# Altium PCB Main-PCB-v1.0-3.PcbDoc (part 3 of 4)
Units mm, origin at the board's own origin, x right, y up, seen from the top; angles counter-clockwise.
Board outline 222.5 x 70.56 mm, 2 copper layers (Top Layer, Bottom Layer), stack 1.448 mm thick; 252 components, 204 nets, 813 pads, 473 vias.
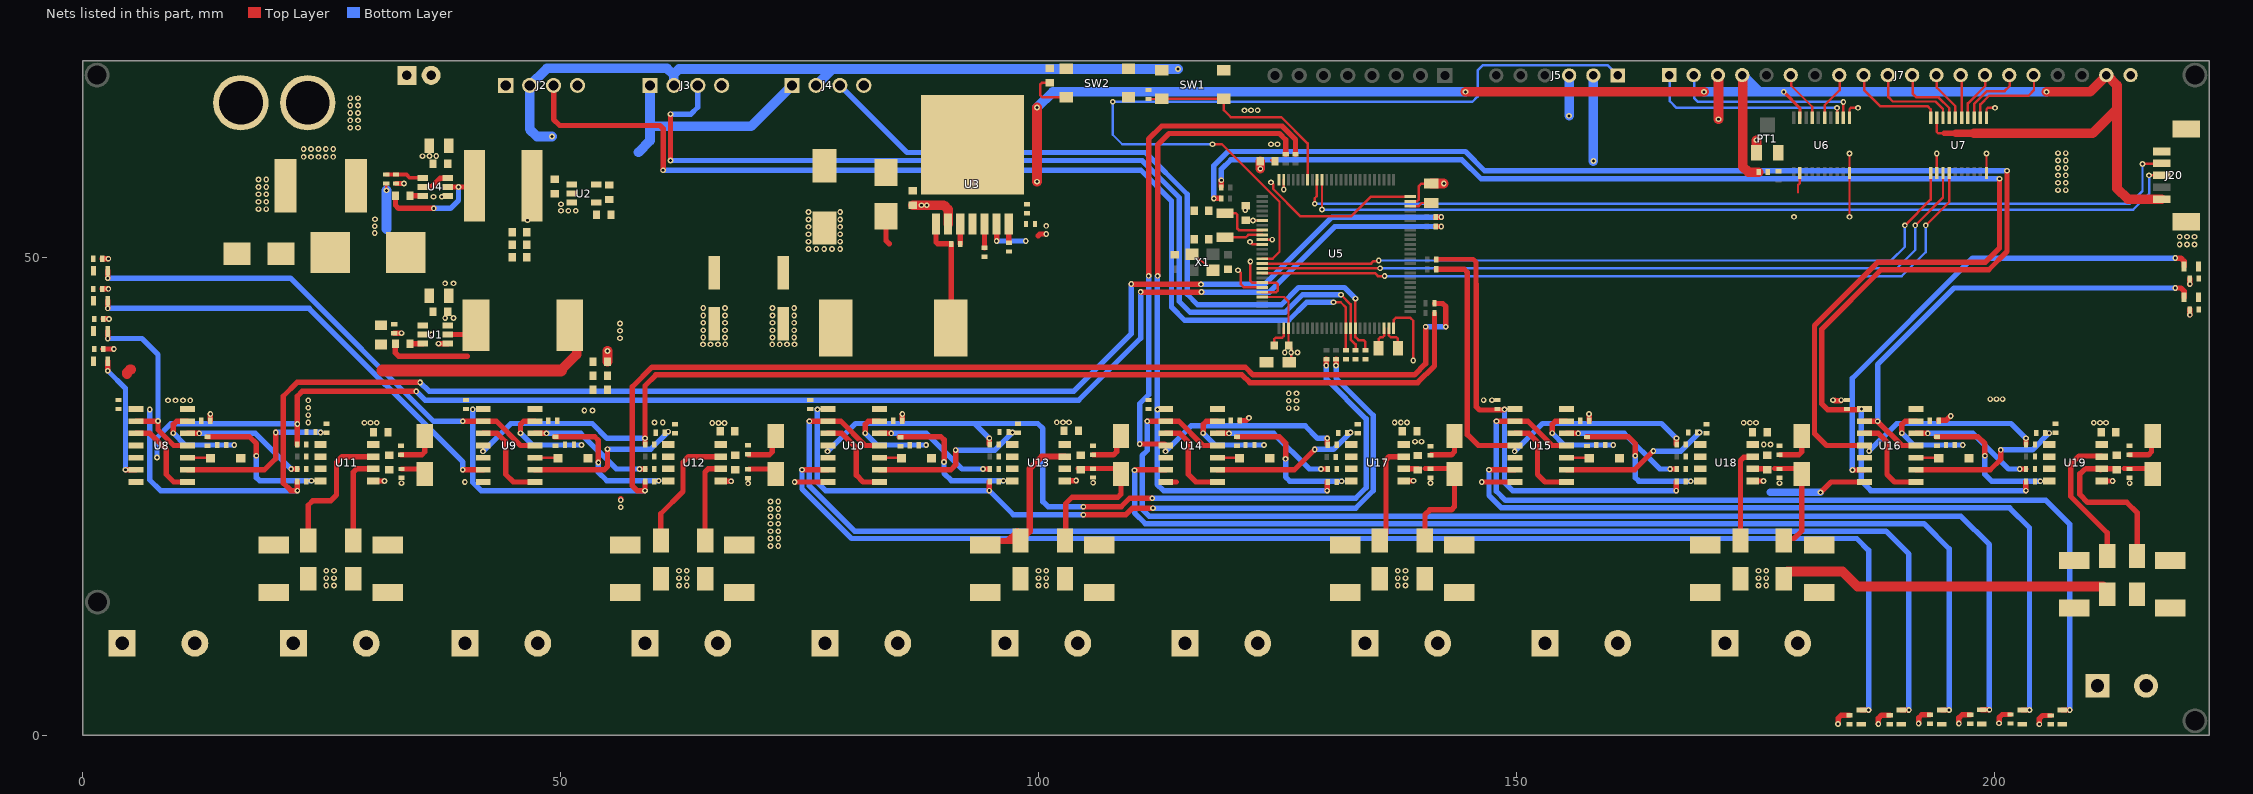
[diagram p2: the nets of this part, all layers, seen from the top]

## Part data (continued)
U3: "IC REG BUCK ADJ 5A TO263-7", Case/Package=TO-263, LCSC Part Number=C2877272, Manufacturer="TI National Semiconductor", Max Operating Temperature=125°C, Max Supply Voltage=40V, Min Input Voltage=8V, Min Operating Temperature=-40°C, Output Current=5A, Output Voltage=37V, Package Quantity=500, Quiescent Current=4.2mA, Supplier Part Number 1=926-LM2679SXADJNOPB, Switching Frequency=260kHz, Category="Voltage Regulators - Switching", ComponentLink1Description=https://datasheet.ciiva.com/6596/lm2679-6596695.pdf?src-supplier=Digi-Key, ComponentLink1URL=https://datasheet.ciiva.com/6596/lm2679-6596695.pdf?src-supplier=Digi-Key, ComponentLink2Description=https://datasheet.ciiva.com/6596/lm2679-6596699.pdf?src-supplier=Digi-Key, ComponentLink2URL=https://datasheet.ciiva.com/6596/lm2679-6596699.pdf?src-supplier=Digi-Key, ComponentLink3Description=https://datasheet.ciiva.com/6596/lm2679-6596693.pdf?src-supplier=Digi-Key, ComponentLink3URL=https://datasheet.ciiva.com/6596/lm2679-6596693.pdf?src-supplier=Digi-Key, ComponentLink4Description=https://datasheet.ciiva.com/41457/001013915-da-01-en-ic-reg-bu-lm2679sx-adj-nopb-to-263-7-tid-41457948.pdf?src-supplier=Conrad, ComponentLink4URL=https://datasheet.ciiva.com/41457/001013915-da-01-en-ic-reg-bu-lm2679sx-adj-nopb-to-263-7-tid-41457948.pdf?src-supplier=Conrad, Efficiency=84%, Item Type=IC, Lead Free="Contains Lead", Manufacturer Part Number=LM2679SX-ADJ/NOPB, Min Supply Voltage=8V, Mounting Technology="Surface Mount", Number of Outputs=1, Output Type=Adjustable, Packaging="Tape and Reel", Pricing 1="1=6.97, 10=6.26, 50=5.92, 100=5.13, 1000=3.72, 10000=3.72 (USD)", RoHS=Yes, RoHS Compliant=Yes, Series="SIMPLE SWITCHER®", Stock 1=3995, Supplier 1=Mouser, Synchronous Rectifier=No
U5: "MCU 32-bit ARM Cortex M4 RISC 1MB Flash 3.3V 100-Pin LQFP Frame", Case/Package=LQFP, LCSC Part Number=C1337293, Manufacturer=STMicroelectronics, Max Operating Temperature=85°C, Min Operating Temperature=-40°C, Supplier Part Number 1=511-STM32F413VGT6, Category=Microcontrollers, ComponentLink1Description=https://4donline.ihs.com/images/VipMasterIC/IC/SGST/SGST-S-A0003533273/SGST-S-A0003533273-1.pdf?hkey=52A5661711E402568146F3353EA87419&src-supplier=Newark, ComponentLink1URL=https://4donline.ihs.com/images/VipMasterIC/IC/SGST/SGST-S-A0003533273/SGST-S-A0003533273-1.pdf?hkey=52A5661711E402568146F3353EA87419&src-supplier=Newark, ComponentLink2Description=https://4donline.ihs.com/images/VipMasterIC/IC/SGST/SGST-S-A0003533273/SGST-S-A0003533273-1.pdf?hkey=52A5661711E402568146F3353EA87419&src-supplier=Farnell, ComponentLink2URL=https://4donline.ihs.com/images/VipMasterIC/IC/SGST/SGST-S-A0003533273/SGST-S-A0003533273-1.pdf?hkey=52A5661711E402568146F3353EA87419&src-supplier=Farnell, ComponentLink3Description=http://www.farnell.com/datasheets/2581760.pdf?src-supplier=Element14, ComponentLink3URL=http://www.farnell.com/datasheets/2581760.pdf?src-supplier=Element14, ComponentLink4Description=http://www.st.com/content/ccc/resource/technical/document/datasheet/group3/f6/1d/4a/d9/f9/96/43/2a/DM00282249/files/DM00282249.pdf/jcr:content/translations/en.DM00282249.pdf?src-supplier=Digi-Key, ComponentLink4URL=http://www.st.com/content/ccc/resource/technical/document/datasheet/group3/f6/1d/4a/d9/f9/96/43/2a/DM00282249/files/DM00282249.pdf/jcr:content/translations/en.DM00282249.pdf?src-supplier=Digi-Key, Core Architecture=ARM, Interface=I2C,SPI,USB,IrDA,MMC,SDIO,UART,USART,EBI/EMI, Item Type=IC, Manufacturer Part Number=STM32F413VGT6, Memory Format=FLASH, Memory Size=1MB, Number of I/Os=81, Oscillator Type=Internal, Packaging=Tray, Peripherals="Brown-out Detect/Reset,POR,PWM,WDT,DMA,LCD", Pricing 1="1=14.15, 10=13, 50=12.46, 100=10.98, 1000=9.77, 10000=9.77 (USD)", RoHS=Yes, RoHS Compliant=Yes, Series=STM32F4, Stock 1=941, Supplier 1=Mouser
U6 U7: "IC 8-BIT TRNSTR 15KV ESD 20TSSOP", Case/Package=TSSOP, High Level Output Current=-20uA, LCSC Part Number=C53406, Low Level Output Current=20uA, Manufacturer="Texas Instruments", Max Operating Temperature=85°C, Max Supply Voltage=5.5V, Min Operating Temperature=-40°C, Min Supply Voltage=1.2V, Package Quantity=2000, Quiescent Current=3.5uA, Supplier Part Number 1=595-TXB0108PWR, Category="Logic ICs", Channel Type=Bidirectional, ComponentLink1Description=https://datasheet.ciiva.com/1508/1789049-1508727.pdf?src-supplier=Element14, ComponentLink1URL=https://datasheet.ciiva.com/1508/1789049-1508727.pdf?src-supplier=Element14, ComponentLink2Description=https://datasheet.ciiva.com/22653/1633674-22653426.pdf?src-supplier=Farnell, ComponentLink2URL=https://datasheet.ciiva.com/22653/1633674-22653426.pdf?src-supplier=Farnell, ComponentLink3Description=https://datasheet.ciiva.com/1628/txb0108-1628712.pdf?src-supplier=Newark, ComponentLink3URL=https://datasheet.ciiva.com/1628/txb0108-1628712.pdf?src-supplier=Newark, ComponentLink4Description=https://datasheet.ciiva.com/4834/sces643e-127095-4834434.pdf?src-supplier=Mouser, ComponentLink4URL=https://datasheet.ciiva.com/4834/sces643e-127095-4834434.pdf?src-supplier=Mouser, ComponentLink5Description=https://datasheet.ciiva.com/15096/getdatasheetpartid-189652-15096226.pdf?src-supplier=Verical, ComponentLink5URL=https://datasheet.ciiva.com/15096/getdatasheetpartid-189652-15096226.pdf?src-supplier=Verical, ComponentLink6Description=https://datasheet.ciiva.com/28499/1811182-28499660.pdf?src-supplier=Element14, ComponentLink6URL=https://datasheet.ciiva.com/28499/1811182-28499660.pdf?src-supplier=Element14, ComponentLink7Description=https://datasheet.ciiva.com/1899/txb0108-1899608.pdf?src-supplier=Digi-Key, ComponentLink7URL=https://datasheet.ciiva.com/1899/txb0108-1899608.pdf?src-supplier=Digi-Key, ComponentLink8Description=https://datasheet.ciiva.com/1899/txb0108-1899607.pdf?src-supplier=Digi-Key, ComponentLink8URL=https://datasheet.ciiva.com/1899/txb0108-1899607.pdf?src-supplier=Digi-Key, ComponentLink9Description=https://datasheet.ciiva.com/1899/txb0108-1899609.pdf?src-supplier=Digi-Key, ComponentLink9URL=https://datasheet.ciiva.com/1899/txb0108-1899609.pdf?src-supplier=Digi-Key, ComponentLink10Description=https://datasheet.ciiva.com/14287/txb0108-14287509.pdf?src-supplier=Avnet, ComponentLink10URL=https://datasheet.ciiva.com/14287/txb0108-14287509.pdf?src-supplier=Avnet, ComponentLink11Description=https://datasheet.ciiva.com/48701/001073833-da-01-en-ic-8-bit-trnstr-txb0108pwr-tssop-20-tid-48701979.pdf?src-supplier=Conrad, ComponentLink11URL=https://datasheet.ciiva.com/48701/001073833-da-01-en-ic-8-bit-trnstr-txb0108pwr-tssop-20-tid-48701979.pdf?src-supplier=Conrad, Data Rate=100Mbps, Height=1.15mm, Item Type=IC, Lead Free="Lead Free", Length=6.5mm, Logic Function=Translator, Manufacturer Part Number=TXB0108PWR, Mounting Technology="Surface Mount", Number of Bits=8, Number of Channels=8, Number of Circuits=1, Number of Inputs=8, Output Current=20uA, Output Type=3-STATE, Packaging="Tape and Reel", Pins=20, Pricing 1="1=1.73, 10=1.55, 50=1.47, 100=1.21, 1000=0.789, 10000=0.694 (USD)", Propagation Delay=4ns, Radiation Hardening=No, Reach SVHC Compliant=No, Rise Time=7.3ns, RoHS=Yes, RoHS Compliant=Yes, Series=-, Stock 1=134319, Supplier 1=Mouser, Termination=SMD/SMT, Turn-On Delay Time=9.5ns, Weight=0.002716oz, Width=4.4mm
U8 U9 U10 U14 U15 U16: "6 16ns@6V,50pF 2uA 2V~6V SOIC-14-208mil Inverters ROHS", Case/Package=SOP, High Level Output Current=-5.2mA, LCSC Part Number=C6812, Low Level Output Current=5.2mA, Manufacturer="Texas Instruments", Max Operating Temperature=85°C, Max Supply Voltage=6V, Min Operating Temperature=-40°C, Min Supply Voltage=2V, Operating Supply Voltage=5V, Package Quantity=1, Quiescent Current=2uA, Supplier Part Number 1=296-12883-1-ND, Category="Logic Gates", ComponentLink1Description=https://datasheet.ciiva.com/15089/getdatasheetpartid-409522-15089683.pdf?src-supplier=Verical, ComponentLink1URL=https://datasheet.ciiva.com/15089/getdatasheetpartid-409522-15089683.pdf?src-supplier=Verical, ComponentLink2Description=https://datasheet.ciiva.com/46439/1834038-46439813.pdf?src-supplier=Element14, ComponentLink2URL=https://datasheet.ciiva.com/46439/1834038-46439813.pdf?src-supplier=Element14, ComponentLink3Description=https://datasheet.ciiva.com/1864/sn74hc04-1864851.pdf?src-supplier=Digi-Key, ComponentLink3URL=https://datasheet.ciiva.com/1864/sn74hc04-1864851.pdf?src-supplier=Digi-Key, ComponentLink4Description=https://datasheet.ciiva.com/1864/sn74hc04-1864850.pdf?src-supplier=Digi-Key, ComponentLink4URL=https://datasheet.ciiva.com/1864/sn74hc04-1864850.pdf?src-supplier=Digi-Key, ComponentLink5Description=https://datasheet.ciiva.com/1864/sn74hc04-1864852.pdf?src-supplier=Digi-Key, ComponentLink5URL=https://datasheet.ciiva.com/1864/sn74hc04-1864852.pdf?src-supplier=Digi-Key, ComponentLink6Description=https://datasheet.ciiva.com/14292/sn54hc04-sp-14292233.pdf?src-supplier=Avnet, ComponentLink6URL=https://datasheet.ciiva.com/14292/sn54hc04-sp-14292233.pdf?src-supplier=Avnet, ComponentLink7Description=https://datasheet.ciiva.com/14288/sn54hc04-sp-14288839.pdf?src-supplier=Avnet, ComponentLink7URL=https://datasheet.ciiva.com/14288/sn54hc04-sp-14288839.pdf?src-supplier=Avnet, Item Type=IC, Lead Free="Lead Free", Logic Function=Buffer,Inverter, Manufacturer Part Number=SN74HC04NSR, Mounting Technology="Surface Mount", Number of Bits=6, Number of Circuits=6, Number of Elements=6, Number of Gates=6, Number of Inputs=1, Packaging="Tape and Reel", Pins=14, Pricing 1="1=0.74, 10=0.65, 25=0.6108, 100=0.4984, 250=0.46296, 500=0.394, 1000=0.3152 (USD)", Propagation Delay=120ns, Radiation Hardening=No, Reach SVHC Compliant=No, RoHS=Yes, RoHS Compliant=Yes, Series=74HC, Stock 1=1936, Supplier 1=Digi-Key, Technology=CMOS, Turn-On Delay Time=20ns, Weight=0.007348oz
U11 U12 U13 U17 U18 U19: "SOP-8 RS-485/RS-422 ICs ROHS", LCSC Part Number=C519086, Manufacturer=HGSEMI, Package=SOP-8, ComponentLink1Description=LCSC, ComponentLink1URL=https://www.lcsc.com/product-detail/RS-485-RS-422-ICs_HGSEMI-SP3485EIM-TR_C519086.html, Item Type=IC, Manufacturer Part Number=SP3485EIM/TR
X1: "16MHz SMD Crystal Resonator 9pF ±10ppm ±30ppm -40℃~+85℃ SMD3225-4P Crystals ROHS", LCSC Part Number=C13738, Manufacturer="Yangxing Tech", Package=SMD3225-4P, ComponentLink1Description=LCSC, ComponentLink1URL=https://www.lcsc.com/product-detail/Crystals_Yangxing-Tech-X322516MLB4SI_C13738.html, Item Type=Crystal, Manufacturer Part Number=X322516MLB4SI
X2: library part NX3215SA-32.768K-STD-MUA-14, "CRYSTAL 32.7680KHZ 6PF SMD", Case/Package=SMD/SMT, ESR (Equivalent Series Resistance)=70kR, Frequency=32.768kHz, Frequency Tolerance=20ppm, LCSC Part Number=C156244, Load Capacitance=6pF, Manufacturer=NDK, Max Operating Temperature=85°C, Min Operating Temperature=-40°C, Supplier Part Number 1=1847854, Category=Crystals, ComponentLink1Description=https://datasheet.ciiva.com/6733/c-nx3215sa-std-mua-9-e-6733110.pdf?src-supplier=Digi-Key, ComponentLink1URL=https://datasheet.ciiva.com/6733/c-nx3215sa-std-mua-9-e-6733110.pdf?src-supplier=Digi-Key, ComponentLink2Description=https://datasheet.ciiva.com/6733/c-nx3215sa-std-mua-9-e-6733111.pdf?src-supplier=Digi-Key, ComponentLink2URL=https://datasheet.ciiva.com/6733/c-nx3215sa-std-mua-9-e-6733111.pdf?src-supplier=Digi-Key, ComponentLink3Description=https://datasheet.ciiva.com/6733/c-nx3215sa-std-mua-9-e-6733112.pdf?src-supplier=Digi-Key, ComponentLink3URL=https://datasheet.ciiva.com/6733/c-nx3215sa-std-mua-9-e-6733112.pdf?src-supplier=Digi-Key, Item Type=Crystal, Manufacturer Part Number=NX3215SA-32.768K-STD-MUA-14, Mounting Technology="Surface Mount", Packaging="Cut Tape", Pricing 1="5=0.15520, 50=0.68600, 100=0.66600, 250=0.65000, 500=0.63400 (GBP)", RoHS=Yes, RoHS Compliant=Yes, Series=NX3215SA, Stock 1=500, Supplier 1=Rs

## Free pads (board coordinates)
  round 2.6 hole 2 mask+0.05: MH(1.499,69.063) MH(1.549,13.919) MH(221.005,69.063) MH(221.005,1.499)

## Via types
v1: diameter 0.6, hole 0.3, Top Layer to Bottom Layer, 473 vias

## Nets (pads, with @x,y where several pads share a name; then routed paths per layer and width w, separated by ;. In a path a pad name is that pad's centre, name@x,y a point inside that pad or via, vN(x,y) a via of type N, cw(c..) or ccw(c..) an arc to the next point about the centre after c; other vN are vias at no path point)
3.3V: C11.1 C22.1 C23.2 C24.2 C26.2 C36.2 C37.2 C38.2 C42.2 C43.2 C44.2 J2.2 J3.2 J4.2 J5.2 R24.2 R25.2 R26.2 R39.2 R41.2 R43.2 R52.1 R54.1 R56.1 R57.2 R58.2 R59.2 R72.2 R74.2 R76.2 R85.1 R87.1 R89.1 SW1.3 SW1.4 U2.5 U5.6 U5.11 U5.19 U5.21 U5.22 U5.28 U5.50 U5.75 U5.100 U6.2 U6.10 U7.2 U7.10 U8.14 U9.14 U10.14 U11.8 U12.8 U13.8 U14.14 U15.14 U16.14 U17.8 U18.8 U19.8 | length 147
  Top Layer w0.254: C24.2@121.686,53.873 121.717,53.843 v1(122.453,53.843) U5.6@123.41,53.843 ; v1(122.123,51.613) 122.123,51.587 122.368,51.343 U5.11@123.41,51.343 ; v1(122.174,49.555) 122.174,47.523 122.355,47.343 U5.19@123.41,47.343 124.87,47.343 125.019,47.194 125.019,46.492 124.87,46.343 U5.21@123.41,46.343 ; U5.22@123.41,45.843 125.683,45.843 126.16,45.366 U5.28@126.16,42.593 126.16,40.767 126.436,40.491 126.436,40.036 v1(126.441,40.03) 126.441,39.295 C22.1@126.16,39.014 ; v1@124.308,57.861 v1(124.333,57.836) ; 124.333,60.173 C26.2@124.676,59.83 ; 124.562,57.633 124.562,57.15 127.432,54.28 132.715,54.28 134.778,56.343 U5.75@138.91,56.343 ; U5.50@137.16,42.593 137.16,43.434 137.389,43.663 138.913,43.663 139.217,43.358 v1(139.217,39.192) ; 179.476,56.82 179.476,57.556 179.665,57.745 U6.2@179.665,58.797 ; v1(184.865,54.225) U6.10@184.865,58.797 v1(184.865,60.849) ; U7.2@193.996,58.797 v1(193.996,60.849) ; U7.10@199.196,58.797 v1(199.196,60.849)
  Top Layer w0.559: v1@183.312,35.027 183.286,35.001 v1@183.947,35.001
  Bottom Layer w1.016: v1(49.098,62.636) 47.523,62.636 46.765,63.395 J2.2@46.765,67.983 48.552,69.769 61.148,69.769 61.743,69.174 ; J3.2@61.853,67.983 61.853,69.168 62.382,69.698 78.438,69.698 ; J4.2@76.723,67.983 78.438,69.698 ; v1(114.605,69.698) 78.438,69.698 ; v1(158.064,60.071) J5.2@158.064,69.026
  other v1: 69.621,26.34 33.35,26.365 177.546,26.365 214.173,26.365 105.72,26.403 141.026,26.391 65.862,32.664 66.51,32.664 67.158,32.664 23.597,32.703 29.464,32.69 30.112,32.69 30.759,32.69 59.822,32.703 60.686,32.703 173.787,32.69 174.434,32.69 175.082,32.69 210.414,32.69 211.061,32.69 211.709,32.69 137.267,32.715 137.914,32.715 138.562,32.715 101.91,32.728 102.558,32.728 103.205,32.728 23.597,33.477 52.482,33.972 53.345,33.972 126.187,34.214 127,34.214 23.597,34.252 126.187,34.989 127,34.989 8.928,35.027 9.703,35.027 10.477,35.027 11.252,35.027 23.597,35.027 146.583,35.052 147.447,35.052 183.134,35.052 183.998,35.052 199.593,35.154 200.241,35.154 200.889,35.154 126.187,35.763 127,35.763 125.768,40.03 127.114,40.03 179.045,54.225 206.68,57.023 207.493,57.023 206.68,57.798 207.493,57.798 206.68,58.572 207.493,58.572 206.68,59.347 207.493,59.347 206.68,60.122 207.493,60.122 206.68,60.896 207.493,60.896 124.333,61.824 125.019,61.824 121.564,65.372 122.25,65.38 122.936,65.38
5V: C5.2 C18.2 C20.2 C21.2 J2.1 J3.1 J4.1 J7.4 J7.19 J20.1 L3.2 R3.2 SB1.1 U2.1 U2.3 U6.19 U7.19 | length 206.4
  Top Layer w0.254: R3.2@31.755,57.721 31.765,57.711 31.765,57.008 v1(31.775,56.998) ; U7.19@193.996,64.597 193.996,63.115 194.145,62.967 194.767,62.967
  Top Layer w0.305: v1(177.978,67.31) 179.665,65.623 U6.19@179.665,64.597
  Top Layer w0.559: 194.767,62.967 195.961,62.967
  Top Layer w0.762: 195.961,62.967 197.891,62.967
  Top Layer w1.016: v1(99.847,57.912) v1(99.847,65.659) ; v1(144.678,67.31) v1(169.647,67.31) ; J7.4@173.685,69.063 173.685,59.498 174.28,58.903 SB1.1@175.374,58.903 ; 197.891,62.967 210.287,62.967 212.852,65.532 ; v1(205.486,67.31) 210.033,67.31 211.785,69.063 212.852,67.996 212.852,65.532 ; J20.1@217.541,56.071 213.982,56.071 212.852,57.201 212.852,65.532
  Bottom Layer w1.016: 31.775,52.959 v1(31.775,56.998) ; 58.141,60.985 59.353,62.198 59.353,63.856 ; J3.1@59.353,67.983 59.353,63.856 ; J4.1@74.223,67.983 69.943,63.703 59.505,63.703 59.353,63.856 ; v1(99.847,65.659) 101.498,67.31 v1(144.678,67.31) ; v1(169.647,67.31) 175.438,67.31 ; J7.4@173.685,69.063 175.438,67.31 ; v1(205.486,67.31) v1(177.978,67.31) 175.438,67.31
  other v1: 46.533,53.873 50.038,54.864 50.813,54.864 51.587,54.864 50.038,55.55
12V: C4.2 C6.2 C8.2 J8.1 J10.1 L1.2 R1.2 | length 22.5
  Top Layer w1.016: 4.623,37.795 4.623,37.948 4.928,38.252 5.08,38.252 ; 50.013,38.151 51.676,39.814 L1.2@51.676,40.615
  Top Layer w1.27: 31.369,38.151 50.013,38.151
24V: C17.1 C19.1 J12.1 J14.1 J16.1 L2.2 R5.1 | length 0.9
  Top Layer w0.559: v1@56.286,24.689 v1@56.286,24.714 ; 99.974,52.248 100.152,52.426 v1(100.813,52.426)
  other v1: 71.958,19.787 72.771,19.787 71.958,20.561 72.771,20.561 71.958,21.336 72.771,21.336 71.958,22.111 72.771,22.111 71.958,22.885 72.771,22.885 71.958,23.66 72.771,23.66 56.286,23.838 71.958,24.435 72.771,24.435 56.286,24.587 64.91,40.889 65.684,40.889 66.459,40.889 67.234,40.889 72.149,40.889 72.923,40.889 73.698,40.889 74.473,40.889 56.21,41.529 64.922,41.593 67.198,41.593 72.161,41.593 74.437,41.593 56.21,42.304 64.922,42.367 67.198,42.367 72.161,42.367 74.437,42.367 56.21,43.078 64.922,43.142 67.198,43.142 72.161,43.142 74.437,43.142 64.922,43.917 67.198,43.917 72.161,43.917 74.437,43.917 64.922,44.691 67.198,44.691 72.161,44.691 74.437,44.691 100.813,53.289
BATT: C1.2 C2.2 C9.1 C10.2 C13.2 C14.2 J1.2 U1.3 U1.5 U3.2 U4.3 U4.5 | length 9.3
  Top Layer w0.559: U1.5@35.586,41.91 v1(36.474,41.91) ; U4.5@35.586,57.353 35.598,57.365 36.512,57.365 37.419,58.273 38.155,58.273 U4.3@38.186,58.303
  Top Layer w1.016: C10.2@86.868,55.448 v1(87.757,55.448) v1(88.316,55.448) 90.094,55.448 90.546,54.996 U3.2@90.546,53.473
  other v1: 37.922,43.637 38.786,43.637 37.922,47.269 38.786,47.269 75.936,50.871 76.753,50.871 77.578,50.871 78.404,50.871 79.248,50.871 75.936,51.633 79.248,51.633 75.936,52.408 79.248,52.408 75.936,53.182 79.248,53.182 75.936,53.957 79.248,53.957 75.936,54.732 79.248,54.732 27.991,63.551 28.804,63.551 27.991,64.325 28.804,64.325 27.991,65.1 28.804,65.1 27.991,65.875 28.804,65.875 27.991,66.65 28.804,66.65
BATT#: F1.1 P1.2
  other v1: 23.114,60.503 23.889,60.503 24.663,60.503 25.438,60.503 26.213,60.503 23.114,61.316 23.889,61.316 24.663,61.316 25.438,61.316 26.213,61.316
BOOT0: R8.2 SW1.1 SW1.2 U5.94 | length 23.1
  Top Layer w0.254: R8.2@111.506,66.561 112.893,66.561 SW1.1@112.904,66.572 SW1.2@119.404,66.572 119.404,65.381 120.142,64.643 125.425,64.643 128.16,61.908 U5.94@128.16,58.093
BUT_1: J2.3 R15.2 U5.40 | length 109.7
  Top Layer w0.254: v1(130.861,45.288) 131.631,45.288 132.16,44.759 U5.40@132.16,42.593 R15.2@132.16,40.272
  Top Layer w0.559: J2.3@49.265,67.983 49.265,64.425 49.911,63.779 60.404,63.779 60.731,63.452 v1(60.731,59.106)
  Bottom Layer w0.559: v1(60.731,59.106) 110.719,59.106 113.919,55.905 113.919,44.78 115.291,43.409 126.187,43.409 128.067,45.288 v1(130.861,45.288)
BUT_2: J3.3 R16.2 U5.41 | length 100.6
  Top Layer w0.254: v1(131.648,46.076) 132.66,45.063 U5.41@132.66,42.593 132.66,41.406 133.186,40.88 R16.2@133.186,40.272
  Top Layer w0.559: v1(61.493,60.122) v1(61.493,64.973)
  Bottom Layer w0.559: v1(61.493,60.122) 110.852,60.122 114.732,56.242 114.732,45.39 115.875,44.247 125.806,44.247 127.635,46.076 v1(131.648,46.076) ; v1(61.493,64.973) 63.627,64.973 64.353,65.699 J3.3@64.353,67.983
BUT_3: J4.3 R23.2 U5.42 | length 77
  Top Layer w0.254: v1(133.172,45.669) 133.166,45.663 133.166,42.599 U5.42@133.16,42.593 133.16,41.642 133.477,41.326 134.01,41.326 134.208,41.128 R23.2@134.208,40.272
  Bottom Layer w0.559: J4.3@79.223,67.983 86.245,60.96 111.199,60.96 115.57,56.589 115.57,46.126 116.662,45.034 125.425,45.034 127.229,46.838 132.004,46.838 v1(133.172,45.669)
DI_LCD: J7.6 U6.17 | length 5.4
  Top Layer w0.254: J7.6@178.765,69.063 178.765,67.945 180.965,65.745 U6.17@180.965,64.597
E_LCD: J7.8 U6.15 | length 5.1
  Top Layer w0.254: U6.15@182.265,64.597 182.265,65.908 183.845,67.488 J7.8@183.845,69.063
EARTH: D10.1 D11.1 D12.1 D13.1 D14.1 D15.1 D22.1 D23.1 D24.1 D25.1 D26.1 D27.1 | length 35.6
  Top Layer w1.016: D25.1@177.978,16.362 177.978,16.739 178.359,17.12 184.125,17.12 185.699,15.545 211.379,15.545 211.831,15.093 D26.1@211.831,14.736
  other v1: 25.476,15.646 26.289,15.646 62.382,15.646 63.195,15.646 100,15.646 100.813,15.646 137.592,15.646 138.405,15.646 175.336,15.646 176.149,15.646 25.476,16.421 26.289,16.421 62.382,16.421 63.195,16.421 100,16.421 100.813,16.421 137.592,16.421 138.405,16.421 175.336,16.421 176.149,16.421 25.476,17.196 26.289,17.196 62.382,17.196 63.195,17.196 100,17.196 100.813,17.196 137.592,17.196 138.405,17.196 175.336,17.196 176.149,17.196
ESP_RX: J20.4 U5.92 | length 94.6
  Top Layer w0.254: v1(128.905,55.601) 128.905,56.176 129.137,56.409 129.137,58.07 U5.92@129.16,58.093 ; v1(215.519,59.766) 217.486,59.766 J20.4@217.541,59.821
  Bottom Layer w0.254: v1(128.905,55.601) 214.198,55.601 215.519,56.921 v1(215.519,59.766)
ESP_TX: J20.3 U5.91 | length 93.7
  Top Layer w0.254: v1(129.667,54.991) U5.91@129.667,58.086 ; v1(216.206,58.571) J20.3@217.541,58.571
  Bottom Layer w0.254: v1@129.565,54.991 214.554,54.991 216.206,56.643 v1(216.206,58.571)
GND: C1.1 C2.1 C4.1 C5.1 C6.1 C7.1 C8.1 C9.2 C10.1 C11.2 C12.1 C13.1 C14.1 C17.2 C18.1 C19.2 C20.1 C21.1 C22.2 C23.1 C24.1 C25.1 C26.1 C27.1 C28.1 C29.1 C30.2 C31.2 C32.1 C33.1 C34.1 C35.1 C36.1 C37.1 C38.1 C39.1 C40.1 C41.1 C42.1 C43.1 C44.1 D2.1 D3.1 J2.4 J3.4 J4.4 J5.3 J7.3 J7.20 J8.2 J10.2 J12.2 J14.2 J16.2 J20.5 J20.MP1 J20.MP2 P1.1 PT1.3 R2.1 R4.1 R6.1 R7.1 R8.1 R15.1 R16.1 R23.1 R27.1 R28.1 R29.1 R30.1 R31.1 R32.1 R51.2 R53.2 R55.2 R60.1 R61.1 R62.1 R63.1 R64.1 R65.1 R84.2 R86.2 R88.2 SW2.3 SW2.4 U1.1 U2.2 U3.4 U3.8 U4.1 U5.10 U5.20 U5.27 U5.49 U5.74 U5.99 U6.11 U7.11 U8.7 U9.7 U10.7 U11.5 U12.5 U13.5 U14.7 U15.7 U16.7 U17.5 U18.5 U19.5 X1.2 X1.4 | length 83.2
  Top Layer w0.254: X1.4@116.065,50.329 116.84,49.784 117.673,49.174 X1.2@118.265,48.629 ; v1(120.879,48.641) 121.182,48.338 121.182,47.169 121.508,46.843 U5.20@123.41,46.843 ; U5.10@123.41,51.843 v1(124.459,51.843) ; C23.1@124.658,40.767 124.658,41.431 124.807,41.58 125.486,41.58 125.66,41.754 U5.27@125.66,42.593 ; v1(125.66,57.08) U5.99@125.66,58.093 ; U5.49@136.66,42.593 136.66,41.83 136.86,41.631 137.463,41.631 137.612,41.482 C25.1@137.612,40.488 ; U5.74@138.91,55.843 138.922,55.855 139.624,55.855 139.802,56.032 139.802,57.455 140.056,57.709 C27.1@141.117,57.709 ; U6.11@184.865,64.597 184.865,65.485 185.014,65.634 v1(185.75,65.634) ; U7.11@199.196,64.597 199.196,65.485 199.345,65.634 v1(200.081,65.634)
  Top Layer w0.559: R28.1@2.057,46.696 v1(2.678,46.696) ; R31.1@2.057,49.843 v1(2.678,49.843) ; R27.1@2.108,40.403 R27.1@2.134,40.403 ; R30.1@2.134,43.55 v1(2.754,43.55) ; R27.1@2.134,40.403 3.243,40.404 v1(3.251,40.411) ; C33.1@13.348,32.893 v1(13.348,33.597) ; U11.5@30.431,26.594 v1(31.572,26.594) ; R2.1@32.593,42.062 v1(33.35,42.062) ; R4.1@32.797,57.721 v1(33.617,57.721) ; v1(37.226,40.96) U1.1@38.186,40.96 ; U12.5@66.702,26.568 v1(67.843,26.568) ; v1(74.491,26.492) U10.7@77.965,26.492 ; C35.1@85.758,32.893 v1(85.758,33.597) ; U13.5@102.801,26.632 v1(103.942,26.632) ; U14.7@113.322,26.492 114.427,26.492 ; C39.1@121.069,32.868 121.12,32.918 121.731,32.918 122.01,33.198 v1(122.022,33.198) ; U17.5@138.107,26.619 v1(139.248,26.619) ; v1(146.38,26.492) U15.7@149.855,26.492 ; C40.1@157.615,32.893 v1(157.615,33.597) ; U18.5@174.728,26.594 v1(175.87,26.594) ; v1(181.839,25.4) 182.931,26.492 U16.7@186.431,26.492 ; v1(183.671,1.168) 183.671,1.755 183.998,2.083 R29.1@184.861,2.083 ; v1(187.884,1.168) 187.884,1.755 188.211,2.083 R32.1@189.074,2.083 ; v1(192.094,1.219) 192.094,1.806 192.422,2.134 R60.1@193.285,2.134 ; C41.1@194.191,32.893 C41.1@194.191,32.898 ; C41.1@194.191,32.931 194.972,32.931 195.442,33.401 v1(195.453,33.401) ; v1(196.305,1.219) 196.305,1.806 196.632,2.134 R63.1@197.495,2.134 ; v1(200.515,1.245) 200.515,1.832 200.843,2.159 R61.1@201.706,2.159 ; v1(204.726,1.143) 204.726,1.73 205.053,2.057 R64.1@205.916,2.057 ; U19.5@211.253,26.594 v1(212.395,26.594) ; v1(220.472,43.977) R65.1@220.472,44.544 ; v1(220.472,47.193) R62.1@220.472,47.76
  Top Layer w1.016: C8.1@54.91,39.065 v1(54.91,40.203) ; v1(123.215,59.258) C26.1@123.215,60.046 ; C27.1@141.117,57.709 v1(142.418,57.709) ; v1(171.145,64.44) J7.3@171.145,69.063 ; PT1.3@175.131,60.93 175.133,60.932 v1(175.133,62.255)
  Bottom Layer w0.762: 176.555,25.4 v1(181.839,25.4)
  Bottom Layer w1.016: v1(155.524,64.795) J5.3@155.524,69.026
  other v1: 39.98,26.492 175.895,30.404 176.606,30.404 139.395,30.709 140.081,30.709 219.405,51.333 220.18,51.333 220.955,51.333 219.405,52.146 220.18,52.146 220.955,52.146 121.641,54.915 18.39,55.037 19.202,55.037 18.39,55.811 19.202,55.811 36.703,56.337 37.567,56.337 18.39,56.586 19.202,56.586 18.39,57.361 19.202,57.361 18.39,58.135 19.202,58.135 35.56,60.579 36.271,60.604 36.982,60.604
MCU_UART1_RX: R9.2 SB6.2 U8.4 U8.5 | length 153.7
  Top Layer w0.559: SB6.2@22.461,30.361 22.461,30.542 22.454,30.55 22.454,35.458 22.962,35.966 v1(34.9,35.966) ; v1@110.719,46.355 v1(117.069,46.355) ; R9.2@141.562,53.213 v1(142.138,53.213)
  Bottom Layer w0.559: v1(7.768,29.058) 7.768,30.323 7.747,30.343 7.747,31.115 9.195,32.563 v1(22.454,32.563) ; v1(34.9,35.966) 35.814,35.052 104.216,35.052 110.693,41.529 v1(110.693,46.38) ; v1(117.069,46.355) 124.155,46.355 131.013,53.213 v1(142.138,53.213)
MCU_UART1_TX: R10.2 R24.1 SB9.2 U8.1 | length 168.4
  Top Layer w0.559: SB9.2@22.457,26.501 22.457,25.582 v1(22.454,25.578) 21.768,25.578 20.98,26.365 20.98,35.458 22.428,36.906 v1(35.306,36.906) ; v1@109.722,47.185 109.739,47.168 v1@117.007,47.168 ; R10.2@141.562,54.204 v1(142.138,54.204)
  Bottom Layer w0.559: v1(7.01,34.061) 7.01,26.695 8.128,25.578 v1(22.454,25.578) ; v1(35.306,36.906) 36.228,35.984 103.701,35.984 109.703,41.986 v1(109.703,47.193) ; v1(117.018,47.168) 123.673,47.168 130.708,54.204 v1(142.138,54.204)
MCU_UART2_RX: R11.2 SB7.2 U9.4 U9.5 | length 114.6
  Top Layer w0.559: SB7.2@58.834,30.404 v1(58.834,31.057) 58.834,36.558 59.969,37.694 121.304,37.694 122.117,36.881 139.681,36.881 141.435,38.634 R11.2@141.435,44.171
  Bottom Layer w0.559: v1(41.874,29.693) 44.795,32.614 53.315,32.614 54.872,31.057 v1(58.834,31.057)
MCU_UART2_TX: R12.2 R25.1 SB10.2 U9.1 | length 132.9
  Top Layer w0.559: SB10.2@58.83,26.501 58.83,25.582 v1(58.826,25.578) 58.014,25.578 57.506,26.086 57.506,36.449 59.563,38.506 121.641,38.506 122.453,37.694 139.344,37.694 140.513,38.862 v1(140.513,42.723) ; R12.2@141.435,45.161 142.294,45.161 142.621,44.834 v1(142.621,42.723)
  Bottom Layer w0.559: v1(40.808,34.087) 40.808,26.439 41.668,25.578 v1(58.826,25.578) ; v1@140.524,42.723 v1@142.61,42.723
MCU_UART3_RX: R13.2 SB8.2 U10.4 U10.5 | length 84.5
  Top Layer w0.559: SB8.2@94.859,30.404 v1(94.859,31.057) ; v1(104.699,23.901) 108.661,23.901 109.55,24.79 v1(111.912,24.79) ; v1(130.119,38.679) R13.2@130.119,39.332
  Bottom Layer w0.559: v1(77.935,29.693) 80.856,32.614 93.302,32.614 ; v1(94.859,31.057) 93.302,32.614 ; v1(104.699,23.901) 100.99,23.901 100.457,24.435 100.457,32.083 99.926,32.614 93.302,32.614 ; v1(111.912,24.79) 133.198,24.79 134.29,25.883 134.29,33.096 130.119,37.267 v1(130.119,38.679)
MCU_UART3_TX: R14.2 R26.1 SB11.2 U10.1 | length 84.5
  Top Layer w0.559: v1(94.851,25.578) 94.855,25.582 SB11.2@94.855,26.501 ; v1(104.699,23.063) 109.144,23.063 109.83,23.749 v1(111.989,23.749) ; v1(131.141,38.679) R14.2@131.141,39.332
  Bottom Layer w0.559: v1(76.868,34.087) 76.868,26.439 77.729,25.578 v1(94.851,25.578) 97.366,23.063 v1(104.699,23.063) ; v1(111.989,23.749) 133.198,23.749 135.026,25.577 135.026,33.452 131.141,37.337 v1(131.141,38.679)
MCU_UART4_RX: R17.2 SB15.2 U14.4 U14.5 | length 72.3
  Top Layer w0.559: v1(110.592,30.455) 113.17,30.455 U14.4@113.322,30.302 ; v1(111.531,48.057) 111.531,62.357 112.903,63.729 125.491,63.729 126.893,62.326 R17.2@126.893,60.795 ; SB15.2@130.216,30.404 v1(130.216,31.057)
  Bottom Layer w0.559: v1(110.592,30.455) 110.592,34.671 111.531,35.611 v1(111.531,48.057) ; v1(113.292,29.693) 115.959,32.36 127.914,32.36 129.217,31.057 v1(130.216,31.057)
MCU_UART4_TX: R18.2 R57.1 SB18.2 U14.1 | length 70.2
  Top Layer w0.559: v1(112.471,48.057) 112.471,61.747 113.665,62.941 125.222,62.941 125.877,62.286 R18.2@125.877,60.795 ; v1(130.208,25.578) 130.212,25.582 SB18.2@130.212,26.501
  Bottom Layer w0.559: v1(112.471,48.057) 112.471,48.046 112.446,48.02 v1(112.446,34.061) 112.446,30.159 112.42,30.134 112.42,26.243 113.086,25.578 v1(130.208,25.578)
MCU_UART5_RX: R19.2 SB16.2 U15.4 U15.5 | length 45.3
  Top Layer w0.559: R19.2@141.605,48.743 144.554,48.743 144.882,48.415 144.882,31.445 146.025,30.302 U15.4@149.855,30.302 ; SB16.2@166.748,30.404 v1(166.748,31.057)
  Bottom Layer w0.559: v1(149.824,29.693) 152.745,32.614 165.191,32.614 v1(166.748,31.057)
MCU_UART5_TX: R20.2 R58.1 SB19.2 U15.1 | length 49.5
  Top Layer w0.508: R20.2@141.605,49.784 145.498,49.784 145.796,49.486 145.796,47.168
  Top Layer w0.559: 145.796,47.168 145.796,34.366 146.152,34.011 148.681,34.011 v1(148.758,34.087) ; v1(166.741,25.578) 166.745,25.582 SB19.2@166.745,26.501
  Bottom Layer w0.559: v1(148.758,34.087) 148.758,26.439 149.618,25.578 v1(166.741,25.578)
MCU_UART6_RX: R21.2 SB17.2 U16.4 U16.5 | length 150.4
  Top Layer w0.559: R21.2@119.134,57.429 v1(119.134,58.057) ; U16.4@186.431,30.302 182.448,30.302 181.204,31.547 181.204,42.864 187.832,49.492 199.098,49.492 200.558,50.952 v1@200.558,58.242 ; SB17.2@203.324,30.404 v1(203.324,31.057)
  Bottom Layer w0.559: v1(119.134,58.057) 119.134,59.215 120.117,60.198 144.323,60.198 146.304,58.217 v1(200.558,58.217) ; v1(186.919,29.718) 189.814,32.614 201.767,32.614 v1(203.324,31.057)
MCU_UART6_TX: R22.2 R59.1 SB20.2 U16.1 | length 157.7
  Top Layer w0.559: v1(118.354,56.159) R22.2@118.981,56.159 ; U16.1@185.765,34.049 182.562,34.049 181.966,34.646 181.966,42.494 188.163,48.692 199.429,48.692 201.346,50.608 v1(201.346,59.055) ; v1(203.317,25.578) 203.321,25.582 SB20.2@203.321,26.501
  Bottom Layer w0.559: v1(118.354,56.159) 118.354,59.603 119.812,61.062 144.681,61.062 146.687,59.055 v1(201.346,59.055) ; v1(186.106,34.112) 186.106,26.568 187.096,25.578 v1(203.317,25.578)
NetC3_1: C3.1 L1.1 U1.2 | length 12
  Top Layer w0.559: C3.1@32.715,40.97 32.715,39.977 33.043,39.649 40.234,39.649 ; U1.2@38.186,41.91 40.185,41.91 L1.1@41.15,42.875
NetC3_2: C3.2 U1.6 | length 1.3
  Top Layer w0.559: C3.2@34.249,40.96 34.255,40.965 35.581,40.965 U1.6@35.586,40.96
NetC7_2: C7.2 U2.4
NetC12_2: C12.2 U3.7 | length 1.9
  Top Layer w0.559: C12.2@96.896,51.537 U3.7@96.896,53.473
NetC15_1: C15.1 D3.2 L2.1 U3.1 | length 15.4
  Top Layer w0.559: D3.2@84.049,54.28 84.049,51.737 84.376,51.41 ; 89.276,51.537 U3.1@89.276,53.473 ; 89.332,51.537 89.459,51.41 89.603,51.41 C15.1@90.876,51.41 L2.1@90.876,42.672
  Top Layer w1.016: L2.1@90.8,42.596 L2.1@90.876,42.672
NetC15_2: C15.2 U3.3 | length 2.1
  Top Layer w0.559: C15.2@91.816,51.41 U3.3@91.816,53.473
NetC16_1: C16.1 L3.1 U4.2 | length 12.3
  Top Layer w0.559: C16.1@32.72,56.439 32.72,55.445 33.048,55.118 v1(36.728,55.118) ; U4.2@38.186,57.353 v1(39.319,57.353) 40.871,57.353 L3.1@40.998,57.48
  Bottom Layer w0.559: v1(36.728,55.118) 38.481,55.118 39.319,55.956 v1(39.319,57.353)
NetC16_2: C16.2 U4.6 | length 1.4
  Top Layer w0.559: C16.2@34.244,56.439 34.262,56.421 35.568,56.421 U4.6@35.586,56.403
NetC25_2: C25.2 U5.48 | length 2.5
  Top Layer w0.254: C25.2@135.58,40.488 135.614,40.522 135.614,41.482 135.763,41.631 136.017,41.631 136.169,41.783 136.169,42.584 U5.48@136.16,42.593
NetC27_2: C27.2 U5.73 | length 2.3
  Top Layer w0.254: U5.73@138.91,55.343 139.772,55.343 140.106,55.677 C27.2@141.117,55.677
NetC30_1: C30.1 U5.8 X2.1 | length 5.5
  Top Layer w0.254: X2.1@119.527,54.595 120.668,54.595 120.817,54.447 120.817,52.992 120.966,52.843 U5.8@123.41,52.843
NetC31_1: C31.1 U5.9 X2.2 | length 4
  Top Layer w0.254: X2.2@119.527,52.095 121.717,52.095 121.964,52.343 U5.9@123.41,52.343
NetC33_2: C33.2 D4.1 R33.2 U8.13 | length 9.4
  Top Layer w0.559: v1(9.474,31.598) 9.474,32.515 9.802,32.842 U8.13@10.968,32.842
  Bottom Layer w0.559: v1(9.474,31.598) 10.719,30.353 v1(15.85,30.353)
NetC34_2: C34.2 D5.1 R34.2 U9.13 | length 9.4
  Top Layer w0.559: v1(45.811,31.598) 45.811,32.515 46.139,32.842 U9.13@47.305,32.842
  Bottom Layer w0.559: v1(45.811,31.598) 47.056,30.353 v1(52.187,30.353)
NetC35_2: C35.2 D6.1 R35.2 U10.13 | length 9.4
  Top Layer w0.559: v1(81.872,31.598) 81.872,32.515 82.199,32.842 U10.13@83.365,32.842
  Bottom Layer w0.559: v1(81.872,31.598) 83.116,30.353 v1(88.247,30.353)
NetC39_2: C39.2 D16.1 R66.2 U14.13 | length 9.4
  Top Layer w0.559: v1(117.229,31.598) 117.229,32.515 117.556,32.842 U14.13@118.722,32.842
  Bottom Layer w0.559: v1(117.229,31.598) 118.473,30.353 v1(123.604,30.353)
NetC40_2: C40.2 D17.1 R67.2 U15.13 | length 9.4
  Top Layer w0.559: v1(153.761,31.598) 153.761,32.515 154.089,32.842 U15.13@155.255,32.842
  Bottom Layer w0.559: v1(153.761,31.598) 155.006,30.353 v1(160.137,30.353)
NetC41_2: C41.2 D18.1 R68.2 U16.13 | length 9.4
  Top Layer w0.559: v1(190.337,31.598) 190.337,32.515 190.665,32.842 U16.13@191.831,32.842
  Bottom Layer w0.559: v1(190.337,31.598) 191.582,30.353 v1(196.713,30.353)
NetD1_1: D1.1 J1.1 | length 0.2
  Bottom Layer w0.254: J1.1@34.569,69.037 J1.1@34.747,69.037
  other v1: 30.556,52.527 30.556,53.251 30.582,53.975
NetD1_2: D1.2 D2.2 F1.2
NetD4_2: D4.2 R33.1 R36.2 U8.10 | length 2.4
  Top Layer w0.254: U8.10@10.968,29.032 13.33,29.032 D4.2@13.381,28.981
NetD5_2: D5.2 R34.1 R37.2 U9.10 | length 2.4
  Top Layer w0.254: U9.10@47.305,29.032 49.667,29.032 D5.2@49.718,28.981
NetD6_2: D6.2 R35.1 R38.2 U10.10 | length 2.4
  Top Layer w0.254: U10.10@83.365,29.032 85.727,29.032 D6.2@85.778,28.981
NetD7_1: D7.1 D11.2 F3.1 R48.1 R52.2 U11.6 | length 12
  Top Layer w0.559: D11.2@28.316,20.362 28.316,27.536 28.643,27.864 U11.6@30.38,27.864 ; R52.2@33.345,27.851 35.244,27.851 D7.1@35.783,27.312
NetD7_2: D7.2 D10.2 F2.1 R48.2 R51.1 U11.7 | length 18.8
  Top Layer w0.559: D10.2@23.597,20.362 23.597,24.054 24.079,24.536 25.959,24.536 26.543,25.121 26.543,28.55 27.127,29.134 U11.7@30.38,29.134 ; R51.1@33.32,29.324 35.456,29.324 35.783,29.652 D7.2@35.783,31.312
NetD8_1: D8.1 D13.2 F5.1 R49.1 R54.2 U12.6 | length 11.9
  Top Layer w0.559: D13.2@65.146,20.362 65.1,20.408 65.1,27.536 65.428,27.864 U12.6@66.753,27.864 ; R54.2@69.718,27.851 D8.1@72.593,27.851
NetD8_2: D8.2 D12.2 F4.1 R49.2 R53.1 U12.7 | length 17.6
  Top Layer w0.559: D12.2@60.503,20.362 60.477,20.388 60.477,23.165 62.814,25.502 62.814,28.55 63.398,29.134 U12.7@66.753,29.134 ; R53.1@69.692,29.324 71.829,29.324 72.156,29.652 D8.2@72.156,31.312
NetD9_1: D9.1 D15.2 F7.1 R50.1 R56.2 U13.6 | length 16.7
  Top Layer w0.559: D15.2@102.768,20.362 102.845,20.439 102.845,24.206 103.53,24.892 108.303,24.892 108.631,25.219 D9.1@108.631,27.312 ; R50.1@104.142,27.889 R56.2@105.715,27.889 D9.1@108.705,27.889
NetD9_2: D9.2 D14.2 F6.1 R50.2 R55.1 U13.7 | length 21.3
  Top Layer w0.559: 96.726,20.333 D14.2@97.78,21.387 ; D14.2@98.12,20.362 99.136,21.378 ; R55.1@105.717,29.324 107.854,29.324 108.181,29.652 D9.2@108.181,31.312
  Top Layer w0.635: 96.133,20.333 96.726,20.333 98.108,20.333 99.085,21.311 99.085,27.889 100.33,29.134 U13.7@102.77,29.134
NetD16_2: D16.2 R66.1 R69.2 U14.10 | length 2.4
  Top Layer w0.254: U14.10@118.722,29.032 121.084,29.032 D16.2@121.135,28.981
NetD17_2: D17.2 R67.1 R70.2 U15.10 | length 2.4
  Top Layer w0.254: U15.10@155.255,29.032 157.617,29.032 D17.2@157.668,28.981
NetD18_2: D18.2 R68.1 R71.2 U16.10 | length 2.4
  Top Layer w0.254: U16.10@191.831,29.032 194.193,29.032 D18.2@194.244,28.981
NetD19_1: D19.1 D23.2 F9.1 R81.1 R85.2 U17.6 | length 14.1
  Top Layer w0.559: U17.6@138.692,27.864 R81.1@139.675,27.864 ; D23.2@140.411,20.362 140.442,20.393 140.442,23.068 140.947,23.574 143.21,23.574 143.538,23.901 D19.1@143.538,27.312 ; 140.482,27.889 D19.1@144.061,27.889
NetD19_2: D19.2 D22.2 F8.1 R81.2 R84.1 U17.7 | length 15
  Top Layer w0.559: D22.2@135.712,20.362 136.36,21.01 136.36,28.806 136.687,29.134 U17.7@138.234,29.134 ; R84.1@141.074,29.324 143.21,29.324 143.538,29.652 D19.2@143.538,31.312
NetD20_1: D20.1 D25.2 F11.1 R82.1 R87.2 U18.6 | length 12.1
  Top Layer w0.559: U18.6@175.224,27.864 R82.1@176.207,27.864 ; 177.015,27.889 D20.1@179.883,27.889 ; D25.2@177.978,20.362 178.181,20.566 179.056,20.566 179.878,21.387 D20.1@179.878,27.312
NetD20_2: D20.2 D24.2 F10.1 R82.2 R86.1 U18.7 | length 13.9
  Top Layer w0.559: D24.2@173.457,20.362 173.457,28.736 173.784,29.063 174.658,29.063 U18.7@174.728,29.134 ; R86.1@177.607,29.324 179.55,29.324 179.878,29.652 D20.2@179.878,31.312
NetD21_1: D21.1 D27.2 F13.1 R83.1 R89.2 U19.6 | length 20
  Top Layer w0.559: U19.6@211.126,27.737 U19.6@211.253,27.864 209.499,27.864 208.966,27.33 208.966,25.171 209.779,24.359 213.868,24.359 214.955,23.272 D27.2@214.955,18.736 ; U19.6@211.8,27.864 R83.1@212.783,27.864 ; 213.591,27.889 D21.1@216.459,27.889
NetD21_2: D21.2 D26.2 F12.1 R83.2 R88.1 U19.7 | length 18.9
  Top Layer w0.559: U19.7@211.253,29.134 211.19,29.197 208.877,29.197 208.001,28.321 208.001,24.994 211.831,21.163 D26.2@211.831,18.736 ; R88.1@214.183,29.324 216.126,29.324 216.454,29.652 D21.2@216.454,31.312
NetF2_2: F2.2 J9.1
NetF3_2: F3.2 J9.2
NetF4_2: F4.2 J11.1
NetF5_2: F5.2 J11.2
NetF6_2: F6.2 J13.1
NetF7_2: F7.2 J13.2
NetF8_2: F8.2 J15.1
NetF9_2: F9.2 J15.2
NetF10_2: F10.2 J17.1
NetF11_2: F11.2 J17.2
NetF12_2: F12.2 J18.1
NetF13_2: F13.2 J18.2
NetJ7_1: J7.1 U6.13 | length 21.6
  Top Layer w0.254: U6.13@183.565,64.597 v1(183.565,65.634)
  Bottom Layer w0.254: J7.1@166.065,69.063 166.065,66.319 166.75,65.634 v1(183.565,65.634)
NetJ7_2: J7.2 U6.12 | length 19.8
  Top Layer w0.254: U6.12@184.215,64.597 v1(184.215,66.254)
  Bottom Layer w0.254: J7.2@168.605,69.063 168.605,66.65 169.001,66.254 v1(184.215,66.254)
NetJ7_9: J7.9 U7.20 | length 10.3
  Top Layer w0.254: J7.9@186.385,69.063 186.385,67.485 188.06,65.81 193.016,65.81 193.346,65.48 U7.20@193.346,64.597
NetJ7_10: J7.10 U7.18 | length 9.5
  Top Layer w0.254: J7.10@188.925,69.063 188.925,66.751 189.382,66.294 193.878,66.294 194.646,65.526 U7.18@194.646,64.597
NetJ7_11: J7.11 U7.17 | length 7.4
  Top Layer w0.254: J7.11@191.465,69.063 191.465,67.132 191.872,66.726 194.183,66.726 195.296,65.613 U7.17@195.296,64.597
NetJ7_12: J7.12 U7.16 | length 5.3
  Top Layer w0.254: J7.12@194.005,69.063 194.005,67.742 195.946,65.801 U7.16@195.946,64.597
NetJ7_13: J7.13 U7.15 | length 4.5
  Top Layer w0.254: J7.13@196.545,69.063 196.6,69.008 U7.15@196.6,64.597
NetJ7_14: J7.14 U7.14 | length 5.2
  Top Layer w0.254: U7.14@197.246,64.597 197.246,66.106 199.072,67.932 199.072,69.049 J7.14@199.085,69.063
NetJ7_15: J7.15 U7.13 | length 7.1
  Top Layer w0.254: U7.13@197.896,64.597 197.896,66.045 199.238,67.386 201.092,67.386 201.625,67.92 J7.15@201.625,69.063
NetJ7_16: J7.16 U7.12 | length 9.4
  Top Layer w0.254: U7.12@198.552,64.406 198.552,65.989 199.466,66.904 203.581,66.904 204.165,67.488 J7.16@204.165,69.063
NetLED1_1: LED1.1 U8.6 | length 13.2
  Top Layer w0.559: v1(2.616,38.125) LED1.1@2.617,39.13 ; v1(4.466,27.762) U8.6@5.568,27.762
  Bottom Layer w0.559: v1(2.616,38.125) 4.466,36.276 v1(4.466,27.762)
NetLED1_2: LED1.2 R27.2
NetLED2_1: LED2.1 U9.6 | length 47.5
  Top Layer w0.559: v1(2.617,44.656) LED2.1@2.617,45.435 ; v1(39.766,27.762) U9.6@41.905,27.762
  Bottom Layer w0.559: v1(2.617,44.656) 23.695,44.656 39.766,28.585 v1(39.766,27.762)
NetLED2_2: LED2.2 R28.2
NetLED3_1: LED3.1 U10.6 | length 136.5
  Top Layer w0.559: v1(75.253,27.762) U10.6@77.965,27.762 ; LED3.1@186.083,2.63 v1@186.861,2.63
  Bottom Layer w0.559: v1(75.253,27.762) 75.253,25.762 80.441,20.574 185.623,20.574 186.861,19.336 v1@186.861,2.64
  other v1: 186.861,2.629
NetLED3_2: LED3.2 R29.2
NetLED4_1: LED4.1 U8.2 U8.11 | length 20.7
  Top Layer w0.559: v1(2.616,41.504) LED4.1@2.617,42.282 ; U8.2@5.568,32.842 7.837,32.842 7.863,32.868 v1(7.874,32.868) 7.874,31.953 9.525,30.302 U8.11@10.968,30.302
  Bottom Layer w0.559: v1(2.616,41.504) 6.198,41.504 7.874,39.827 v1(7.874,32.868)
NetLED4_2: LED4.2 R30.2
NetLED5_1: LED5.1 U9.2 U9.11 | length 52.7
  Top Layer w0.559: v1(2.617,47.809) LED5.1@2.617,48.587 ; v1(39.766,32.842) U9.2@41.905,32.842 43.271,32.842 45.811,30.302 U9.11@47.305,30.302
  Bottom Layer w0.559: v1(2.617,47.809) 21.736,47.809 36.703,32.842 v1(39.766,32.842)
NetLED5_2: LED5.2 R31.2
NetLED6_1: LED6.1 U10.2 U10.11 | length 150.2
  Top Layer w0.559: v1(76.026,32.842) U10.2@77.965,32.842 79.332,32.842 81.872,30.302 U10.11@83.365,30.302 ; LED6.1@190.294,2.63 v1(191.072,2.629)
  Bottom Layer w0.559: v1(76.026,32.842) 76.026,26.082 80.761,21.347 188.66,21.347 191.078,18.929 v1@191.078,2.629
NetLED6_2: LED6.2 R32.2
NetLED7_1: LED7.1 U14.6 | length 112.2
  Top Layer w0.559: v1(110.058,27.711) 110.069,27.711 110.12,27.762 U14.6@113.322,27.762 ; LED7.1@194.504,2.63 v1(195.282,2.629)
  Bottom Layer w0.559: v1(110.058,27.711) 110.058,23.241 111.176,22.123 192.659,22.123 195.282,19.5 v1(195.282,2.629)
NetLED7_2: LED7.2 R60.2
NetLED8_1: LED8.1 U15.6 | length 83.2
  Top Layer w0.559: v1(147.142,27.762) U15.6@149.855,27.762 ; LED8.1@202.925,2.63 v1(203.703,2.629)
  Bottom Layer w0.559: v1(147.142,27.762) 147.142,25.07 148.438,23.774 201.625,23.774 203.703,21.696 v1(203.703,2.629)
NetLED8_2: LED8.2 R61.2
NetLED9_1: LED9.1 U16.6 | length 51.5
  Top Layer w0.559: v1@185.166,27.742 186.41,27.742 U16.6@186.431,27.762 ; v1@218.967,49.911 218.967,49.903 219.547,49.903 219.874,49.576 LED9.1@219.874,49.03
  Bottom Layer w0.559: v1@185.166,27.711 v1(185.166,27.737) 185.166,37.338 197.739,49.911 v1(218.948,49.911)
NetLED9_2: LED9.2 R62.2
NetLED10_1: LED10.1 U14.2 U14.11 | length 126.1
  Top Layer w0.559: v1(111.383,32.842) U14.2@113.322,32.842 114.689,32.842 117.229,30.302 U14.11@118.722,30.302 ; LED10.1@198.715,2.655 v1@199.492,2.655
  Bottom Layer w0.559: v1(111.383,32.842) 111.383,29.772 110.846,29.235 110.846,23.647 111.596,22.897 196.534,22.897 199.493,19.938 v1(199.493,2.655)
NetLED10_2: LED10.2 R63.2
NetLED11_1: LED11.1 U15.2 U15.11 | length 97.4
  Top Layer w0.559: v1(147.915,32.842) U15.2@149.855,32.842 151.221,32.842 153.761,30.302 U15.11@155.255,30.302 ; LED11.1@207.136,2.63 v1(207.914,2.629)
  Bottom Layer w0.559: v1(147.915,32.842) 147.915,25.516 148.869,24.562 205.41,24.562 207.914,22.058 v1(207.914,2.629)
NetLED11_2: LED11.2 R64.2
NetLED12_1: LED12.1 U16.2 U16.11 | length 48.6
  Top Layer w0.559: U16.2@186.431,32.842 v1(187.808,32.842) 187.808,32.832 190.337,30.302 U16.11@191.831,30.302 ; v1(218.948,46.787) 218.956,46.779 219.547,46.779 219.874,46.452 LED12.1@219.874,45.814
  Bottom Layer w0.559: v1(187.808,32.842) 187.808,38.786 195.809,46.787 v1(218.948,46.787)
NetLED12_2: LED12.2 R65.2
NetPT1_1: PT1.1 SB1.2 SB2.2
NetR1_1: R1.1 R2.2 U1.4 | length 0.1
  Top Layer w0.559: R1.1@31.222,42.748 R1.1@31.303,42.829
NetR3_1: R3.1 R4.2 U4.4 | length 4
  Top Layer w0.381: R3.1@31.755,58.661 R4.2@32.797,58.661 33.871,58.661 34.229,58.303 U4.4@35.586,58.303
NetR5_2: R5.2 R7.2 U3.6 | length 4.8
  Top Layer w0.559: v1(95.626,51.694) U3.6@95.626,53.473
  Bottom Layer w0.559: v1(95.626,51.694) v1(98.674,51.694)
NetR6_2: R6.2 U3.5 | length 2.5
  Top Layer w0.559: R6.2@94.356,50.99 U3.5@94.356,53.473
NetR36_1: R36.1 SB9.1 U11.4 | length 14.9
  Top Layer w0.559: R36.1@13.05,31.217 17.45,31.217 18.161,30.505 v1(18.161,29.235)
  Bottom Layer w0.559: v1(18.161,29.235) 18.161,26.947 18.488,26.619 v1(23.927,26.619)
NetR37_1: R37.1 SB10.1 U12.4 | length 14.7
  Top Layer w0.559: R37.1@49.388,31.217 53.571,31.217 53.95,30.838 v1(53.95,28.524)
  Bottom Layer w0.559: v1(53.95,28.524) 53.95,27.495 54.826,26.619 v1(60.264,26.619)
NetR38_1: R38.1 SB11.1 U13.4 | length 14.8
  Top Layer w0.559: R38.1@85.448,31.217 89.8,31.217 90.127,30.889 90.127,28.583 v1(90.119,28.575)
  Bottom Layer w0.559: v1(90.119,28.575) 90.119,27.386 90.886,26.619 v1(96.324,26.619)
NetR39_1: R39.1 R40.1 U8.9 | length 17.2
  Top Layer w0.559: U8.9@10.968,27.762 19.025,27.762 20.193,28.931 v1(20.193,31.674)
  Bottom Layer w0.559: v1(20.193,31.674) v1(24.892,31.674)
NetR40_2: R40.2 SB6.1 U11.1
NetR41_1: R41.1 R42.1 U9.9 | length 16.7
  Top Layer w0.559: U9.9@47.305,27.762 54.587,27.762 54.915,28.09 v1(54.915,29.921)
  Bottom Layer w0.559: v1(54.915,29.921) 59.431,29.921 61.246,31.737 v1@61.254,31.737
  other v1: 61.26,31.75
NetR42_2: R42.2 SB7.1 U12.1
NetR43_1: R43.1 R44.1 U10.9 | length 16.5
  Top Layer w0.559: U10.9@83.365,27.762 90.83,27.762 91.338,28.27 v1(91.338,29.82)
  Bottom Layer w0.559: v1(91.338,29.82) 95.435,29.82 v1(97.29,31.674)
NetR44_2: R44.2 SB8.1 U13.1
NetR45_1: R45.1 U8.12 | length 13
  Top Layer w0.559: U8.12@10.968,31.572 v1(12.192,31.572) ; v1(21.808,27.838) R45.1@22.461,27.838
  Bottom Layer w0.559: v1(12.192,31.572) 18.074,31.572 v1(21.808,27.838)
NetR45_2: R45.2 SB3.2 U11.2 U11.3
NetR46_1: R46.1 U9.12 | length 13.1
  Top Layer w0.559: U9.12@47.305,31.572 v1(48.529,31.572) ; v1(58.263,27.838) R46.1@58.834,27.838
  Bottom Layer w0.559: v1(48.529,31.572) 52.095,31.572 55.829,27.838 v1(58.263,27.838)
NetR46_2: R46.2 SB4.2 U12.2 U12.3
NetR47_1: R47.1 U10.12 | length 13
  Top Layer w0.559: U10.12@83.365,31.572 v1(84.59,31.572) ; v1(94.206,27.838) R47.1@94.859,27.838
  Bottom Layer w0.559: v1(84.59,31.572) 88.265,31.572 91.999,27.838 v1(94.206,27.838)
NetR47_2: R47.2 SB5.2 U13.2 U13.3
NetR69_1: R69.1 SB18.1 U17.4 | length 14.9
  Top Layer w0.559: R69.1@120.805,31.217 125.204,31.217 125.857,30.564 v1(125.857,28.905)
  Bottom Layer w0.559: v1(125.857,28.905) 125.857,27.005 126.294,26.568 v1(131.724,26.568)
NetR70_1: R70.1 SB19.1 U18.4 | length 14.9
  Top Layer w0.559: R70.1@157.338,31.217 161.737,31.217 162.448,30.505 v1(162.448,29.235)
  Bottom Layer w0.559: v1(162.448,29.235) 162.448,26.947 162.826,26.568 v1(168.257,26.568)
NetR71_1: R71.1 SB20.1 U19.4 | length 14.7
  Top Layer w0.559: R71.1@193.914,31.217 198.313,31.217 199.024,30.505 v1(199.024,29.235)
  Bottom Layer w0.559: v1(199.024,29.235) 199.024,27.264 199.72,26.568 v1(204.833,26.568)
NetR72_1: R72.1 R73.1 U14.9 | length 15.5
  Top Layer w0.559: U14.9@118.722,27.762 126.779,27.762 v1(128.913,29.896)
  Bottom Layer w0.559: v1(128.913,29.896) 130.868,29.896 v1(132.646,31.674)
NetR73_2: R73.2 SB15.1 U17.1
NetR74_1: R74.1 R75.1 U15.9 | length 15.5
  Top Layer w0.559: U15.9@155.255,27.762 162.382,27.762 v1@164.33,29.71
  Bottom Layer w0.559: v1(164.338,29.718) 167.223,29.718 v1(169.179,31.674)
NetR75_2: R75.2 SB16.1 U18.1
NetR76_1: R76.1 R77.1 U16.9 | length 16.1
  Top Layer w0.559: U16.9@191.831,27.762 199.593,27.762 200.685,28.854 v1(200.685,29.845)
  Bottom Layer w0.559: v1(200.685,29.845) 204.013,29.845 205.758,31.59 v1@205.758,31.617
  other v1: 205.765,31.598
NetR77_2: R77.2 SB17.1 U19.1
NetR78_1: R78.1 U14.12 | length 13
  Top Layer w0.559: U14.12@118.722,31.572 v1(119.946,31.572) ; v1(129.563,27.838) R78.1@130.216,27.838
  Bottom Layer w0.559: v1(119.946,31.572) 124.612,31.572 128.346,27.838 v1(129.563,27.838)
NetR78_2: R78.2 SB12.2 U17.2 U17.3
NetR79_1: R79.1 U15.12 | length 13
  Top Layer w0.559: U15.12@155.255,31.572 v1(156.479,31.572) ; v1(166.095,27.838) R79.1@166.748,27.838
  Bottom Layer w0.559: v1(156.479,31.572) 161.29,31.572 165.024,27.838 v1(166.095,27.838)
NetR79_2: R79.2 SB13.2 U18.2 U18.3
NetR80_1: R80.1 U16.12 | length 13
  Top Layer w0.559: U16.12@191.831,31.572 v1(193.055,31.572) ; v1(202.671,27.838) R80.1@203.324,27.838
  Bottom Layer w0.559: v1(193.055,31.572) 197.764,31.572 201.498,27.838 v1(202.671,27.838)
NetR80_2: R80.2 SB14.2 U19.2 U19.3
NetU8_3: U8.3 U8.8 | length 9
  Top Layer w0.559: U8.3@5.568,31.572 7.036,31.572 8.738,29.87 8.738,27.28 9.525,26.492 U8.8@10.968,26.492
NetU9_3: U9.3 U9.8 | length 9.5
  Top Layer w0.559: U9.3@41.905,31.572 43.373,31.572 44.262,30.683 44.262,27.28 45.049,26.492 U9.8@47.305,26.492
NetU10_3: U10.3 U10.8 | length 9.2
  Top Layer w0.559: U10.3@77.965,31.572 79.433,31.572 80.95,30.056 80.95,27.203 81.661,26.492 U10.8@83.365,26.492
NetU14_3: U14.3 U14.8 | length 9.5
  Top Layer w0.559: U14.3@113.322,31.572 114.79,31.572 115.679,30.683 115.679,27.28 116.467,26.492 U14.8@118.722,26.492
NetU15_3: U15.3 U15.8 | length 9.5
  Top Layer w0.559: U15.3@149.855,31.572 151.323,31.572 152.212,30.683 152.212,27.28 152.999,26.492 U15.8@155.255,26.492
NetU16_3: U16.3 U16.8 | length 9.5
  Top Layer w0.559: U16.3@186.431,31.572 187.899,31.572 188.788,30.683 188.788,27.28 189.575,26.492 U16.8@191.831,26.492
NRST: C32.2 J5.1 SW2.1 SW2.2 U5.14 | length 92.6
  Top Layer w0.254: C32.2@101.168,68.25 100.355,68.25 100.178,68.072 100.178,66.98 100.433,66.724 SW2.1@102.915,66.724 ; v1(118.212,61.824) 119.202,61.824 125.222,55.804 125.222,50.571 124.493,49.843 U5.14@123.41,49.843
  Bottom Layer w0.254: v1(118.212,61.824) 108.763,61.824 107.772,62.814 v1(107.772,66.269) 145.415,66.269 145.948,66.802 145.948,69.545 146.507,70.104 159.526,70.104 J5.1@160.604,69.026
PC0: U5.15 U7.1 | length 76.8
  Top Layer w0.254: U5.15@123.41,49.343 134.803,49.343 135.051,49.591 135.544,49.591 v1(135.611,49.657) ; v1(190.652,53.34) 193.346,56.034 U7.1@193.346,58.797
  Bottom Layer w0.254: v1(135.611,49.657) 189.205,49.657 190.652,51.105 v1(190.652,53.34)
PC1: U5.16 U7.3 | length 78.3
  Top Layer w0.254: U5.16@123.41,48.843 v1@135.736,48.843 ; v1(191.745,53.34) 194.646,56.241 U7.3@194.646,58.797
  Bottom Layer w0.254: v1(135.75,48.856) 189.826,48.856 191.745,50.775 v1(191.745,53.34)
PC2: U5.17 U7.4 | length 79.9
  Top Layer w0.254: U5.17@123.41,48.343 135.198,48.343 135.509,48.031 v1(136.22,48.031) ; v1(192.837,53.34) 195.296,55.799 U7.4@195.296,58.797
  Bottom Layer w0.254: v1(136.22,48.031) 190.322,48.031 192.837,50.546 v1(192.837,53.34)